# Altium PCB EMG-Arm-ELEC-V2.0.PcbDoc (part 1 of 5)
Units mil, origin at the board's own origin, x right, y up, seen from the top; angles counter-clockwise.
Board outline 8303.83 x 7532.25 mil, 2 copper layers (Top Layer, Bottom Layer), stack 3.556 mil thick; 263 components, 174 nets, 696 pads, 313 vias.
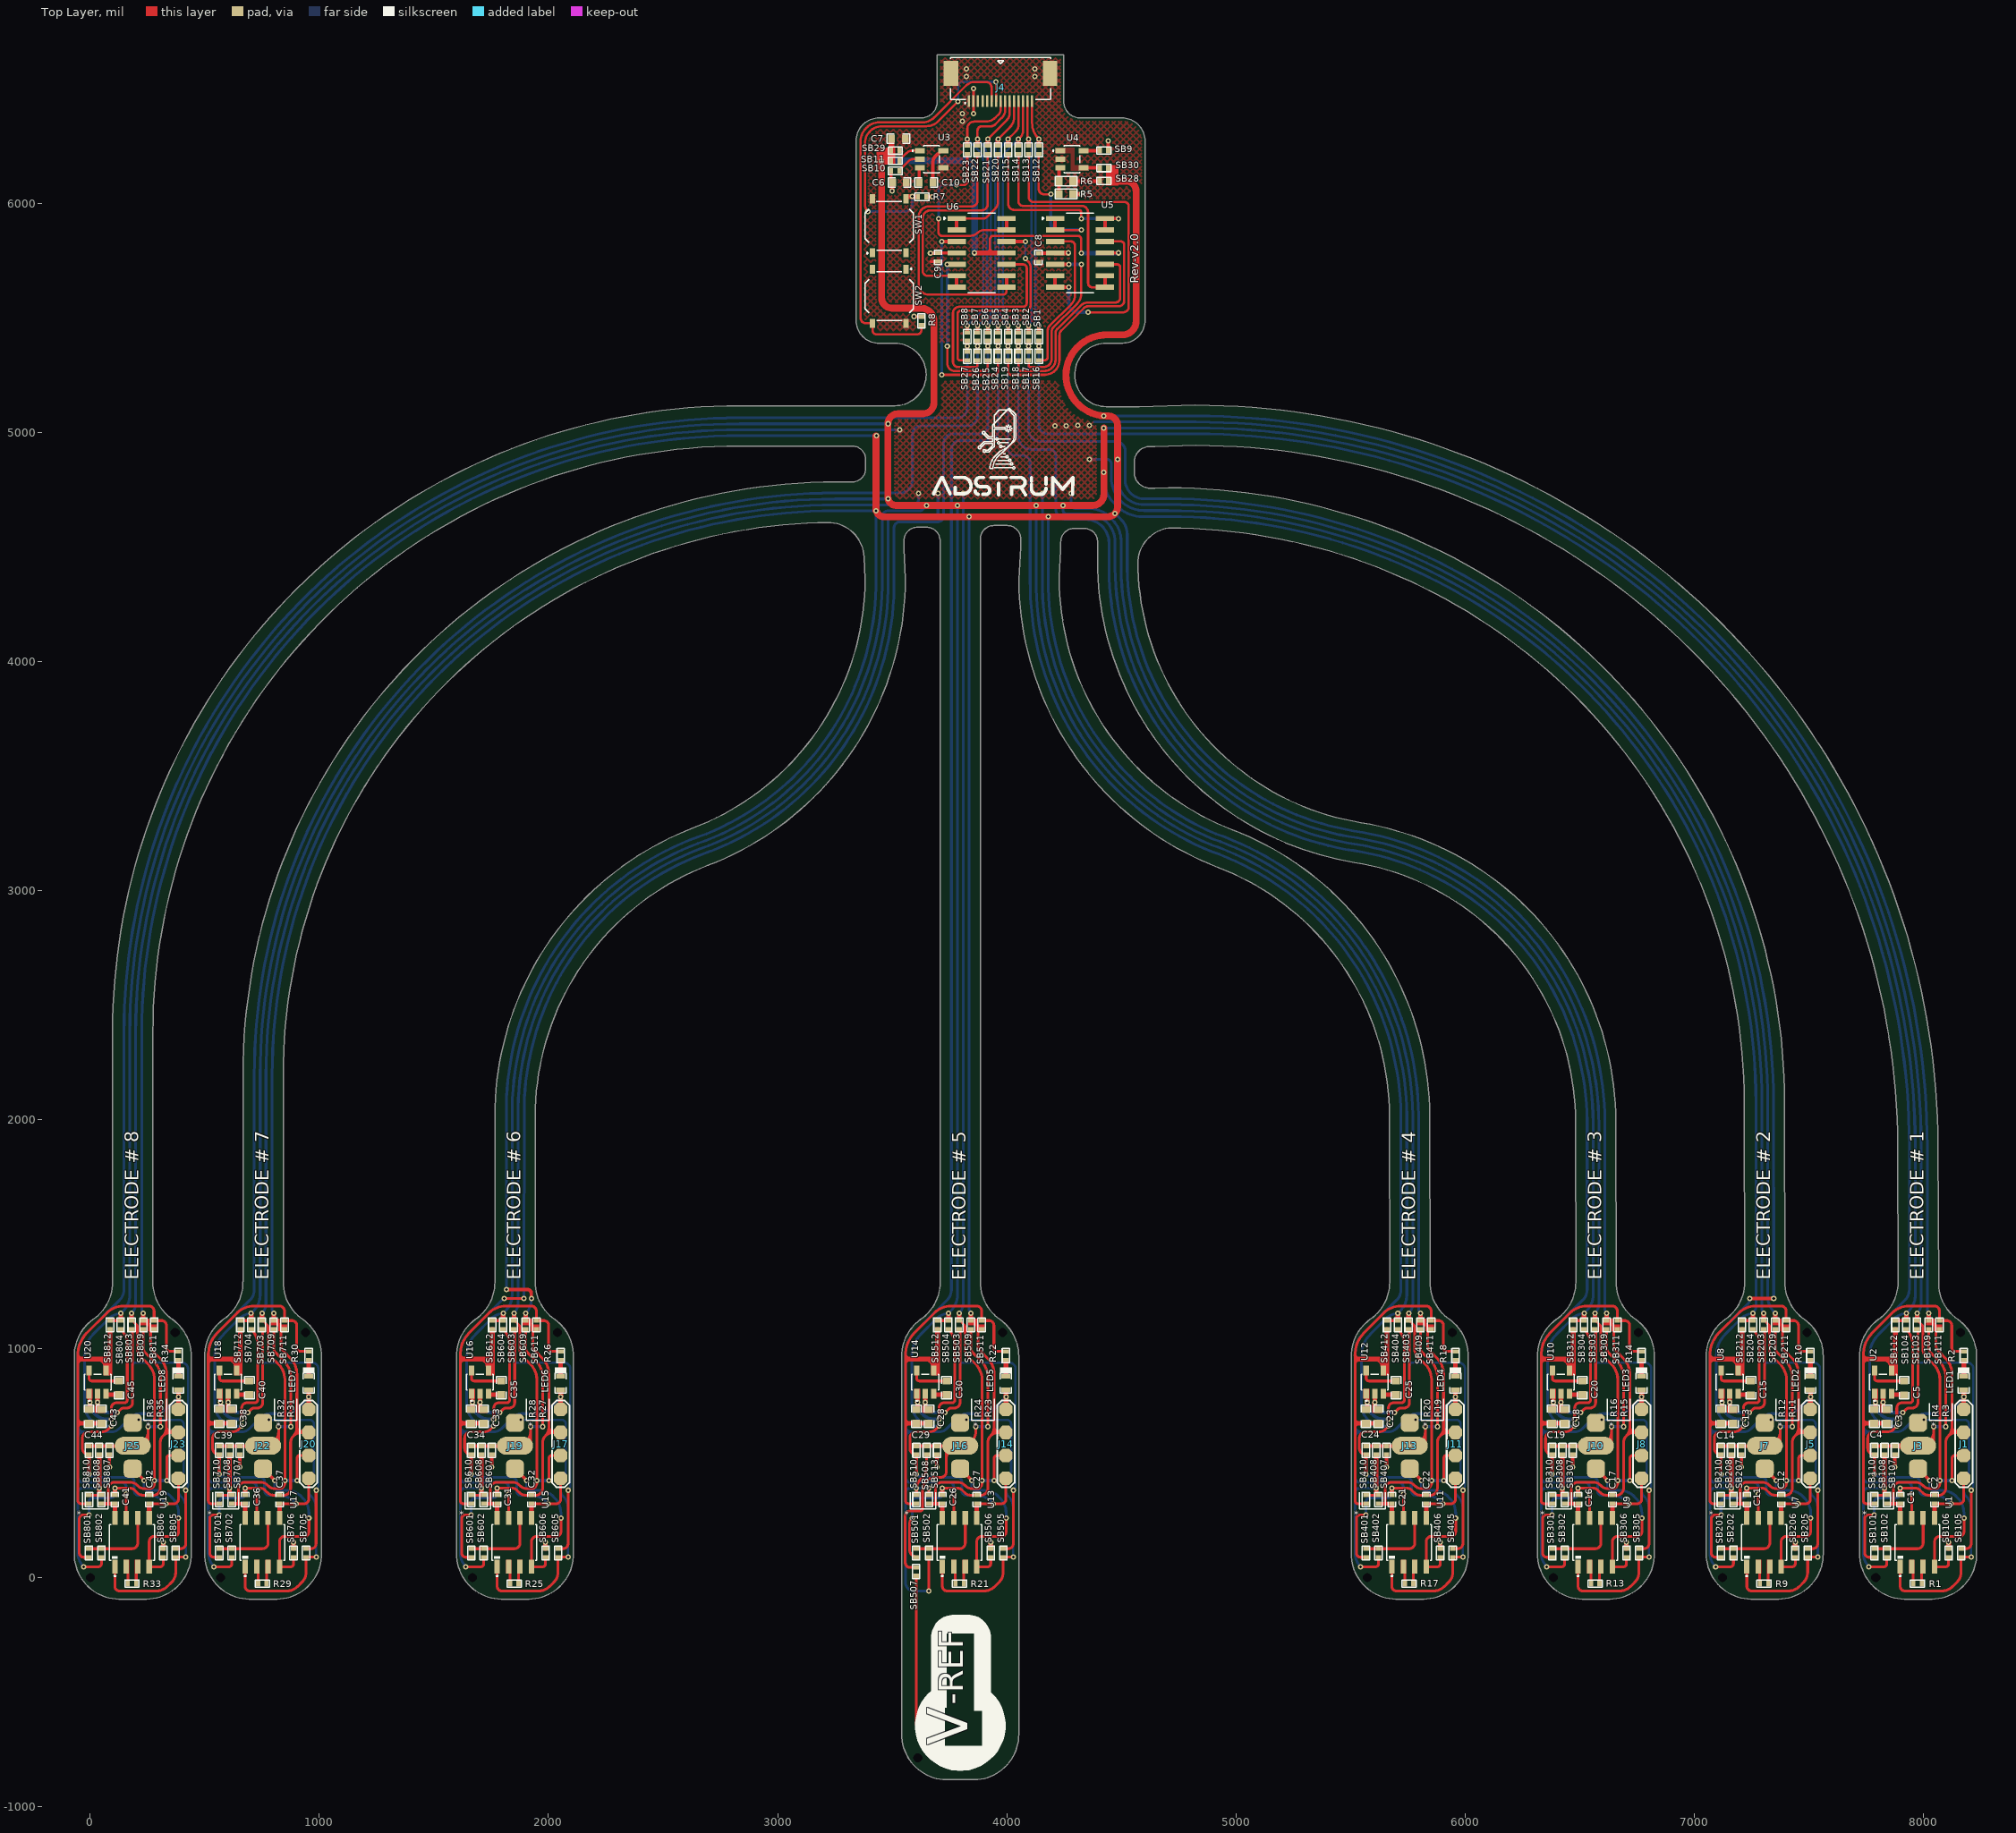
[diagram p0: Top Layer view]
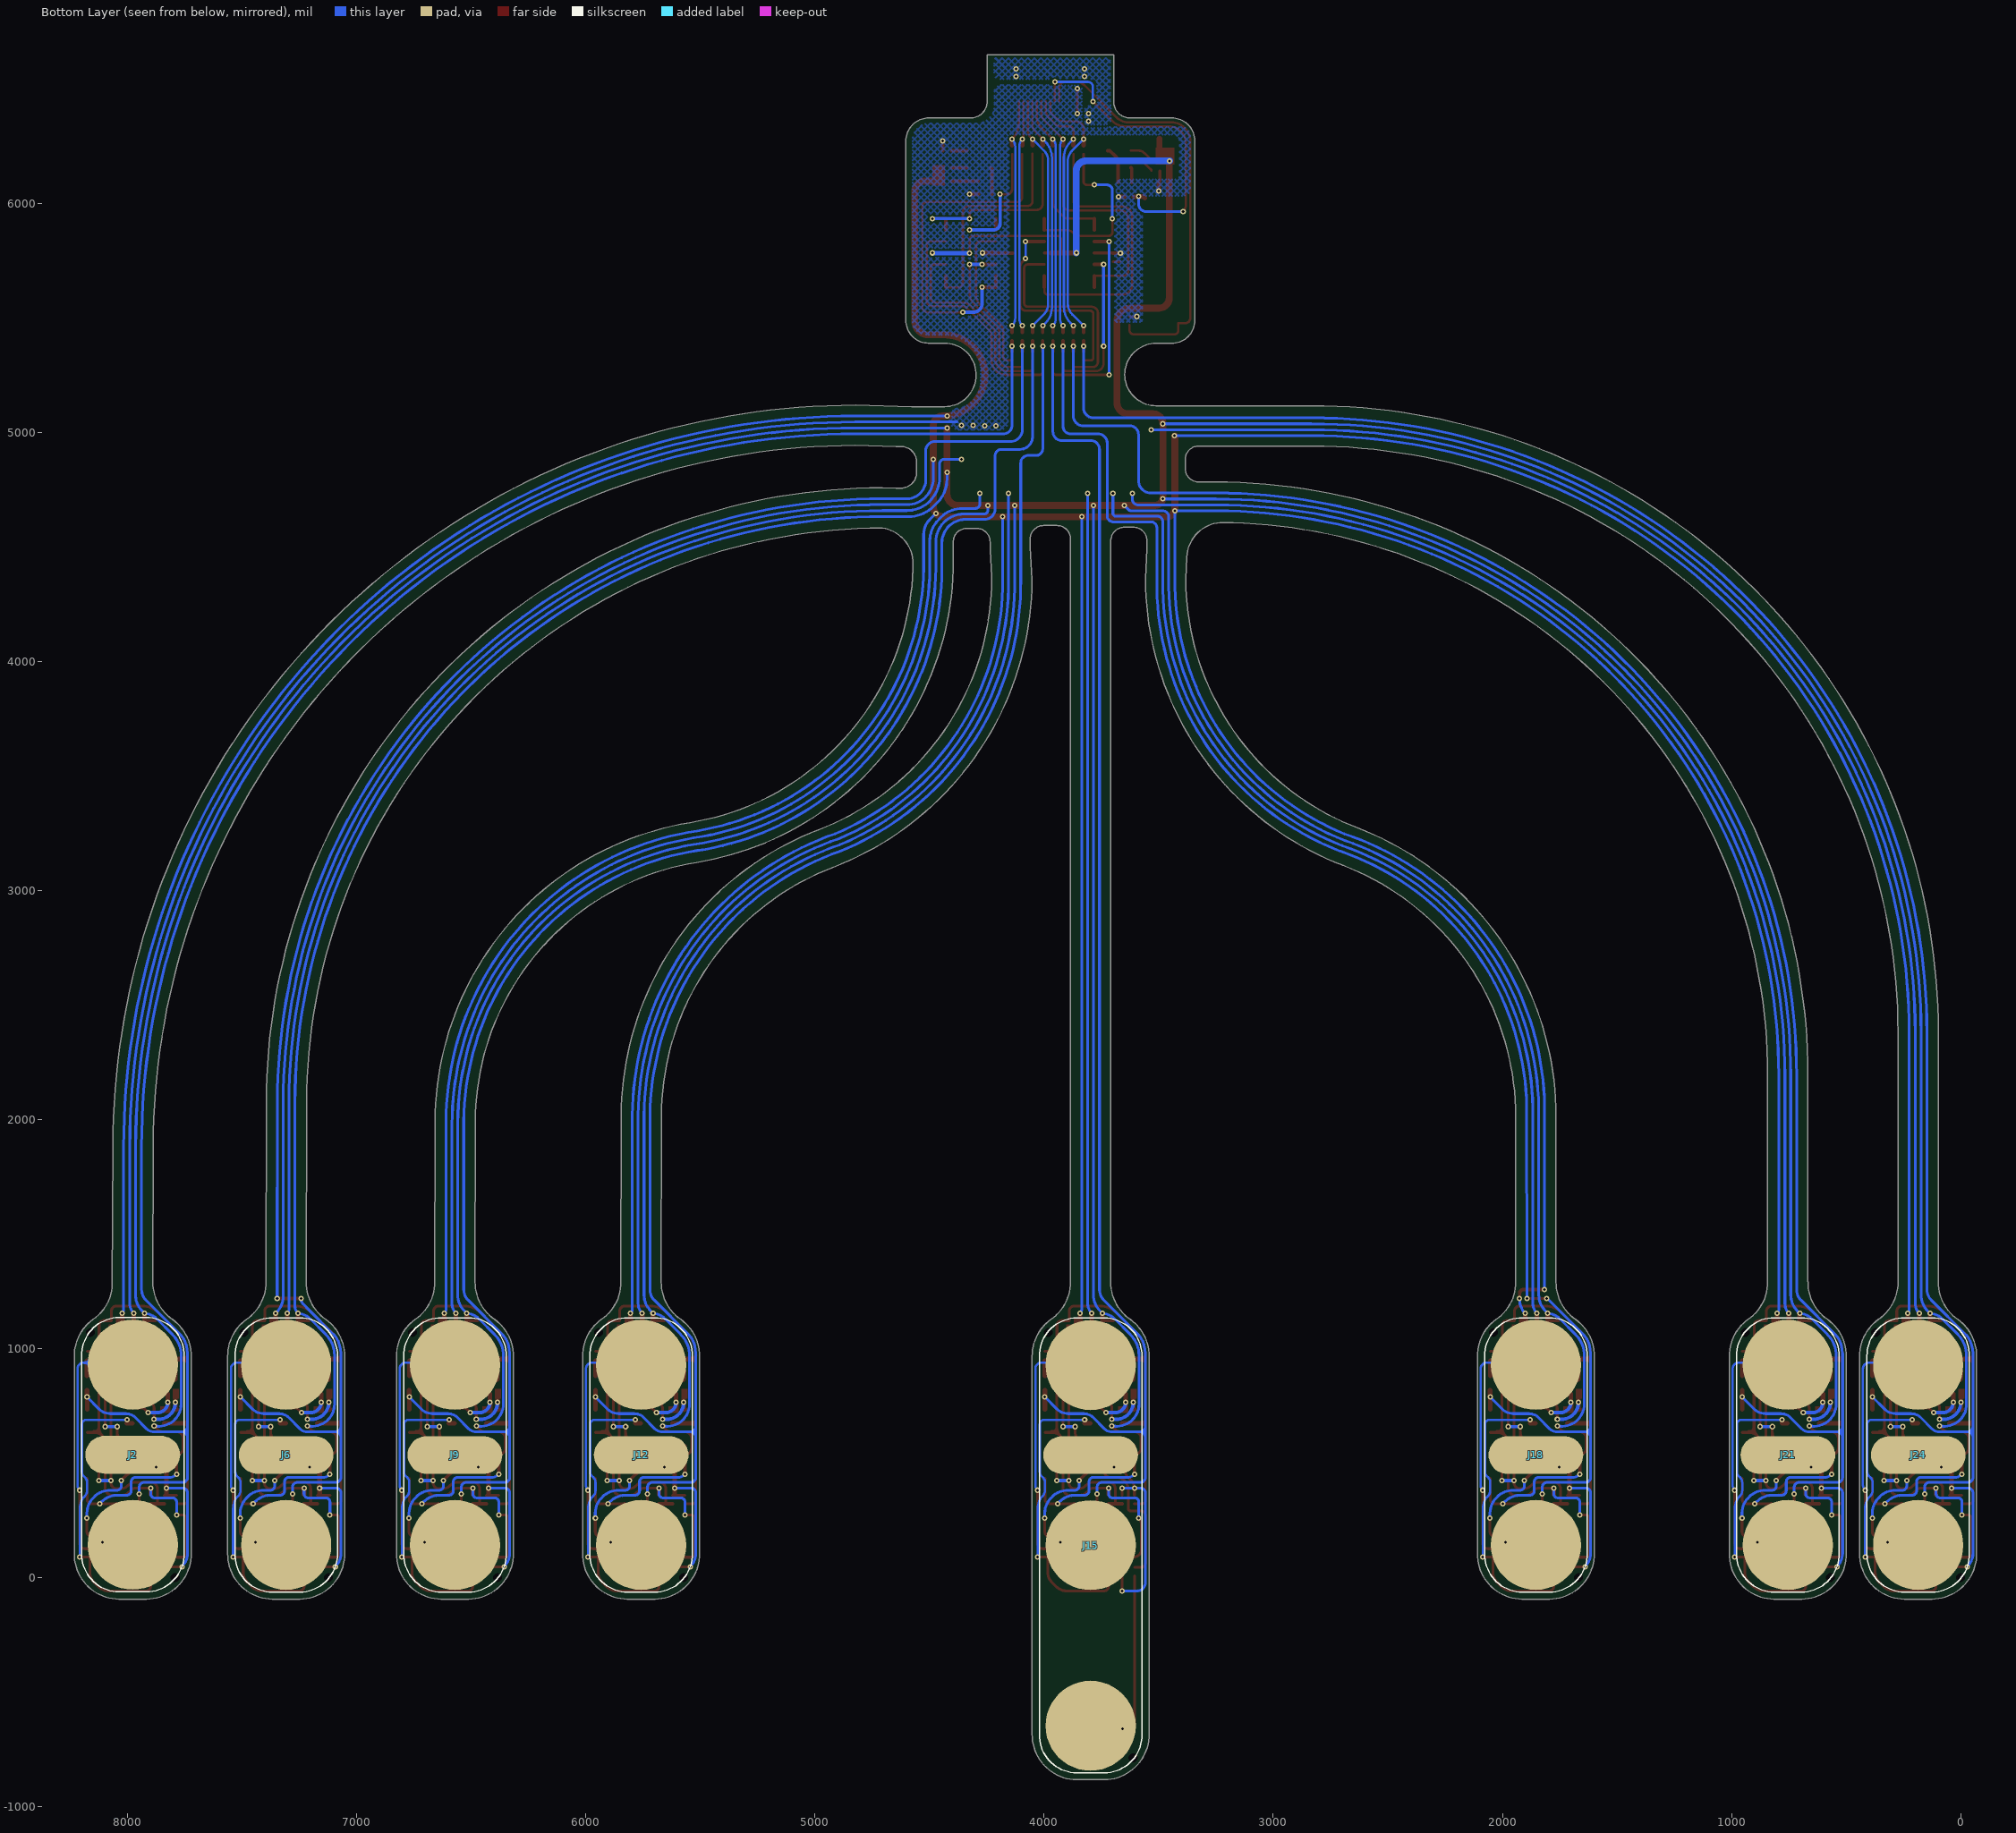
[diagram p1: Bottom Layer view, seen from below]

## Layer stack, top to bottom
Top Solder: solder mask 0.5, Solder Resist, Dk 3.5
Top Layer: signal copper 1.378
Dielectric 1: dielectric 0.8, Flex, Dk 4.8
Bottom Layer: signal copper 1.378
Bottom Solder: solder mask 0.5, Solder Resist, Dk 3.5

## Board outline
-70,104.26 ccw(c126.84,102.05) 124.63,-94.79 245.86,-94.79 ccw(c243.65,102.05) 440.49,104.26 440.49,964.73 ccw(c243.67,966.94) 358.69,1126.66 358.63,1126.58 cw(c470.07,1288.83) 273.25,1291.04 273.24,1291.04 273.24,2378.83 cw(c2834.23,2378.83) 2834.29,4939.83 3325.21,4939.83 cw(c3325.21,4880.77) 3384.26,4880.77 3384.26,4841.93 cw(c3325.21,4841.93) 3325.21,4782.87 3255.48,4782.87 ccw(c3255.52,2193.58) 666.23,2193.58 666.23,1291.04 666.22,1291.04 cw(c469.4,1288.83) 580.84,1126.58 580.79,1126.66 ccw(c695.8,966.94) 498.98,964.73 498.98,104.27 ccw(c695.82,102.05) 693.6,-94.79 814.84,-94.79 ccw(c812.63,102.05) 1009.47,104.26 1009.46,964.73 ccw(c812.65,966.94) 927.66,1126.66 927.61,1126.58 cw(c1039.05,1288.83) 842.23,1291.04 842.22,1291.04 842.22,2193.58 cw(c3255.52,2193.58) 3128.55,4603.55 cw(c3234.74,2193.71) 3219.49,4605.84 cw(c3220.49,4448.36) 3377.84,4454.78 3381.76,4358.72 cw(c2215.67,4361.9) 2632.93,3273.02 ccw(c3116.02,2012.41) 1766.02,2012.44 1766.02,1291.04 1766,1291.04 cw(c1569.19,1288.83) 1680.63,1126.58 1680.57,1126.66 ccw(c1795.58,966.94) 1598.77,964.73 1598.76,104.27 ccw(c1795.6,102.05) 1793.39,-94.79 1914.62,-94.79 ccw(c1912.41,102.05) 2109.25,104.26 2109.25,964.73 ccw(c1912.43,966.94) 2027.45,1126.66 2027.39,1126.58 cw(c2138.83,1288.83) 1942.01,1291.04 1942,1291.04 1942,2012.44 cw(c3116.02,2012.41) 2695.9,3108.69 ccw(c2215.67,4361.9) 3557.75,4360.43 3557.75,4362.18 3552.54,4489.77 3552.13,4533.39 cw(c3610.76,4526.35) 3610.76,4585.41 3650.17,4585.41 cw(c3650.17,4526.35) 3708.8,4533.39 3709.22,4531.82 3709.22,4526.82 3709.22,4526.35 3709.22,4510.82 3709.49,1291.04 cw(c3512.67,1288.83) 3624.11,1126.58 3624.05,1126.66 ccw(c3739.07,966.94) 3542.25,964.73 3542.24,-684.15 ccw(c3739.08,-686.36) 3736.87,-883.2 3858.1,-883.2 ccw(c3855.89,-686.36) 4052.73,-684.15 4052.73,964.73 ccw(c3855.92,966.94) 3970.93,1126.66 3970.87,1126.6 cw(c4082.29,1288.82) 3885.5,1291.03 3885.21,4497.17 3885.21,4536.86 3885.63,4540.8 cw(c3944.26,4533.75) 3944.26,4592.81 4002.22,4592.81 cw(c4002.22,4533.75) 4060.85,4540.8 4060.53,4497.17 4052.73,4357.28 4052.76,4354.28 ccw(c5409.7,4366.62) 4922.45,3100.12 4922.56,3100.07 cw(c4505.83,2012.62) 5670.39,2014.6 5671.65,1291.04 cw(c5474.84,1288.83) 5586.28,1126.58 5586.22,1126.66 ccw(c5701.23,966.94) 5504.42,964.73 5504.41,104.27 ccw(c5701.25,102.05) 5699.04,-94.79 5820.27,-94.79 ccw(c5818.06,102.05) 6014.9,104.26 6014.9,964.73 ccw(c5818.08,966.94) 5933.1,1126.66 5933.04,1126.58 cw(c6044.48,1288.83) 5847.66,1291.04 5847.64,1291.04 5846.38,2014.91 ccw(c4505.83,2012.62) 4985.54,3264.41 cw(c5409.7,4366.62) 4250.32,4141.6 cw(c5418.61,4362.09) 4229.7,4362.09 4229.73,4370.52 4236.1,4484.91 4236.1,4521.26 cw(c4295.15,4521.26) 4295.15,4580.31 4338.1,4580.31 cw(c4338.1,4521.26) 4397.15,4521.26 4397.15,4477.64 4397.05,4477.64 4396.52,4440.26 ccw(c5732.96,4440.77) 5518.25,3121.69 cw(c5333.55,1987.03) 6483.14,1989.04 6484.36,1291.03 cw(c6287.55,1288.82) 6398.99,1126.58 6398.93,1126.66 ccw(c6513.95,966.93) 6317.13,964.72 6317.12,104.26 ccw(c6513.96,102.05) 6511.75,-94.79 6632.98,-94.79 ccw(c6630.77,102.05) 6827.61,104.26 6827.61,964.72 ccw(c6630.79,966.93) 6745.81,1126.66 6745.75,1126.58 cw(c6857.19,1288.82) 6660.37,1291.03 6660.35,1291.04 6659.13,1989.35 ccw(c5333.55,1987.03) 5546.52,3295.39 cw(c5732.97,4440.76) 4572.52,4440.33 cw(c4729.33,4425.89) 4706,4581.63 cw(c4706.54,2068.44) 7219.73,2072.88 7221.11,1291.04 cw(c7024.3,1288.83) 7135.74,1126.58 7135.68,1126.67 ccw(c7250.69,966.94) 7053.88,964.73 7053.87,104.27 ccw(c7250.71,102.05) 7248.5,-94.78 7369.73,-94.78 ccw(c7367.52,102.05) 7564.36,104.26 7564.36,964.73 ccw(c7367.54,966.94) 7482.56,1126.66 7482.5,1126.58 cw(c7593.94,1288.83) 7397.12,1291.04 7397.1,1291.05 7395.72,2073.19 ccw(c4706.54,2068.44) 4705.96,4757.61 4705.96,4757.63 4647.3,4756.67 4618.94,4756.67 cw(c4625.02,4824.72) 4556.7,4824.72 4556.7,4869.66 cw(c4625.02,4869.66) 4619.1,4937.72 4647.3,4937.72 4825.22,4942.26 cw(c4824.92,1877.62) 7889.55,1882.97 7890.59,1291.04 cw(c7693.77,1288.83) 7805.21,1126.58 7805.15,1126.66 ccw(c7920.17,966.94) 7723.35,964.72 7723.35,104.27 ccw(c7920.19,102.05) 7917.97,-94.79 8039.21,-94.79 ccw(c8037,102.05) 8233.83,104.26 8233.83,964.72 ccw(c8037.01,966.93) 8152.03,1126.66 8151.74,1126.74 cw(c8261.29,1286.23) 8067.9,1280.27 8065.54,1883.28 ccw(c4824.92,1877.62) 4824.02,5118.25 4822.96,5118.25 4578.3,5112.01 4434.22,5112.01 cw(c4434.22,5248.13) 4298.1,5248.13 cw(c4434.13,5253.04) 4434.13,5389.16 4505.79,5389.16 ccw(c4505.79,5486.35) 4574.52,5417.62 ccw(c4503.84,5488.3) 4603.79,5488.3 4603.79,6272.28 ccw(c4503.75,6272.28) 4574.49,6343.03 ccw(c4503.81,6272.35) 4503.81,6372.3 4321.09,6372.3 cw(c4321.09,6443.82) 4249.58,6443.82 4249.58,6649.05 3696.9,6649.05 3696.9,6443.82 cw(c3625.39,6443.82) 3625.39,6372.3 3442.67,6372.3 ccw(c3442.67,6272.35) 3371.99,6343.03 ccw(c3442.74,6272.28) 3342.69,6272.28 3342.69,5488.3 ccw(c3442.64,5488.3) 3371.97,5417.62 ccw(c3443.37,5489.02) 3443.37,5388.05 3512.26,5388.05 cw(c3512.26,5251.93) 3648.38,5251.93 cw(c3512.26,5251.93) 3512.26,5115.81 2834.29,5115.81 ccw(c2834.23,2378.83) 97.26,2378.83 97.25,1291.04 97.24,1291.04 cw(c-99.57,1288.83) 11.87,1126.58 11.81,1126.66 ccw(c126.82,966.94) -69.99,964.73

## Design rules (kind name [scope] priority, off if disabled: settings)
BoardOutlineClearance [All] p1: gap=0 ignorepadtopadclearanceinfootprint=FALSE except(9: Arc-OutlineEdge Track-OutlineEdge; 10: SMDPad-OutlineEdge THPad-OutlineEdge Via-OutlineEdge Fill-OutlineEdge Poly-OutlineEdge Region-OutlineEdge)
Clearance [All] p1: gap=7 ignorepadtopadclearanceinfootprint=FALSE except(5: SMDPad-SMDPad)
ComponentClearance [All] p1: gap=0 collisioncheckmode=3 verticalgap=0 showdistances=FALSE
MinimumSolderMaskSliver [All] p1: minsoldermaskwidth=0
PolygonConnect [All] p1: connectstyle=Direct reliefconductorwidth=10 reliefentries=4 polygonreliefangle="90 Angle" airgapwidth=10
RoutingVias [All] p1: holewidth=11.81 width=23.62 viastyle="Through Hole" minholewidth=7.87 minwidth=13.78 maxholewidth=31.5 maxwidth=62.99
SilkToSilkClearance [All] p1: silktosilkclearance=0
SilkToSolderMaskClearance [IsPad] p1: minsilkscreentomaskgap=0 clearancetoexposedcopper=TRUE
SolderMaskExpansion [All] p1: expansion=4 istentingtop=FALSE
SupplyNets "Schematic Supply Nets_27" [InNet('GND_ELEC6')] p1: voltage=0.000
SupplyNets "Schematic Supply Nets_26" [InNet('GND_ELEC2')] p2: voltage=0.000
SupplyNets "Schematic Supply Nets_25" [InNet('VCC/2-4')] p3: voltage=0.000
SupplyNets "Schematic Supply Nets_24" [InNet('GND_ELEC7')] p4: voltage=0.000
SupplyNets "Schematic Supply Nets_23" [InNet('GND_ELEC5')] p5: voltage=0.000
SupplyNets "Schematic Supply Nets_22" [InNet('VCC/2-8')] p6: voltage=0.000
SupplyNets "Schematic Supply Nets_21" [InNet('VCC/2-2')] p7: voltage=0.000
SupplyNets "Schematic Supply Nets_20" [InNet('-VCC_3V3')] p8: voltage=0.000
SupplyNets "Schematic Supply Nets_19" [InNet('GND')] p9: voltage=0.000
SupplyNets "Schematic Supply Nets_18" [InNet('VCC/2-6')] p10: voltage=0.000
SupplyNets "Schematic Supply Nets_17" [InNet('VCC/2-7')] p11: voltage=0.000
SupplyNets "Schematic Supply Nets_16" [InNet('GND_ELEC3')] p12: voltage=0.000
SupplyNets "Schematic Supply Nets_15" [InNet('VCC/2-3')] p13: voltage=0.000
SupplyNets "Schematic Supply Nets_14" [InNet('VREF')] p14: voltage=0.000
SupplyNets "Schematic Supply Nets_13" [InNet('VCC_3V3')] p15: voltage=0.000
SupplyNets "Schematic Supply Nets_12" [InNet('GND_ELEC8')] p16: voltage=0.000
SupplyNets "Schematic Supply Nets_11" [InNet('GND_ELEC4')] p17: voltage=0.000
SupplyNets "Schematic Supply Nets_10" [InNet('GND_ELEC1')] p18: voltage=0.000
SupplyNets "Schematic Supply Nets_9" [InNet('VCC/2-1')] p19: voltage=0.000
SupplyNets "Schematic Supply Nets_8" [InNet('VCC/2-5')] p20: voltage=0.000
SupplyNets "Schematic Supply Nets_4" [InNet('VREF_GND')] p21: voltage=0.000
Width [All] p1: maxlimit=50 minlimit=10 preferedwidth=15 minimp=50.000000 maximp=50.000000 favimp=50.000000
26 further rules are at their usual default settings.

## Classes and differential pairs
component class U_Opamp_Sheet: C6 C7 C8 C9 C10 R5 R6 SB1 SB2 SB3 SB4 SB5 SB6 SB7 SB8 SB9 SB10 SB11 SB12 SB13 SB14 SB15 SB16 SB17 SB18 SB19 SB20 SB21 SB22 SB23 SB24 SB25 SB26 SB27 U3 U4 U5 U6
component class U_Electrode_Sheet8: C41 C42 C43 C44 C45 J23 J24 J25 LED8 R33 R34 R35 R36 SB801 SB802 SB803 SB804 SB805 SB806 SB807 SB808 SB809 SB810 SB811 SB812 U19 U20
component class U_Electrode_Sheet7: C36 C37 C38 C39 C40 J20 J21 J22 LED7 R29 R30 R31 R32 SB701 SB702 SB703 SB704 SB705 SB706 SB707 SB708 SB709 SB710 SB711 SB712 U17 U18
component class U_Electrode_Sheet6: C31 C32 C33 C34 C35 J17 J18 J19 LED6 R25 R26 R27 R28 SB601 SB602 SB603 SB604 SB605 SB606 SB607 SB608 SB609 SB610 SB611 SB612 U15 U16
component class U_Electrode_Sheet5: C26 C27 C28 C29 C30 J14 J15 J16 LED5 R21 R22 R23 R24 SB501 SB502 SB503 SB504 SB505 SB506 SB507 SB508 SB509 SB510 SB511 SB512 SB513 U13 U14
component class U_Electrode_Sheet4: C21 C22 C23 C24 C25 J11 J12 J13 LED4 R17 R18 R19 R20 SB401 SB402 SB403 SB404 SB405 SB406 SB407 SB408 SB409 SB410 SB411 SB412 U11 U12
component class U_Electrode_Sheet3: C16 C17 C18 C19 C20 J8 J9 J10 LED3 R13 R14 R15 R16 SB301 SB302 SB303 SB304 SB305 SB306 SB307 SB308 SB309 SB310 SB311 SB312 U9 U10
component class U_Electrode_Sheet2: C11 C12 C13 C14 C15 J5 J6 J7 LED2 R9 R10 R11 R12 SB201 SB202 SB203 SB204 SB205 SB206 SB207 SB208 SB209 SB210 SB211 SB212 U7 U8
component class U_Electrode_Sheet1: C1 C2 C3 C4 C5 J1 J2 J3 LED1 R1 R2 R3 R4 SB101 SB102 SB103 SB104 SB105 SB106 SB107 SB108 SB109 SB110 SB111 SB112 U1 U2
component class U_Connector-Sheet: J4 R7 R8 SB28 SB29 SB30 SW1 SW2

## Components (designator, comment, footprint, x,y, rotation, side; value= is the part's Value field where it differs from the comment)
C1 "1uF" Cap-0402 7900.38,340.55 r90 top
C2 "1uF" Cap-0402 8050.38,340.55 r90 top
C3 "10uF" Cap-0603 7841.84,703.04 r90 top
C4 "10uF" Cap-0603 7787.38,703.05 r90 top
C5 "10uF" Cap-0603 7917.69,827.72 r270 top
C6 "10uF" Cap-0603 3531.89,6090.49 r0 top
C7 "10uF" Cap-0603 3527.38,6282.05 r0 top
C8 "0.1uF" Cap-0402 4138.38,5763.05 r270 top
C9 "0.1uF" Cap-0402 3699.55,5764.05 r270 top
C10 "10uF" Cap-0603 3648.26,6090.49 r180 top
C11 "1uF" Cap-0402 7230.91,340.55 r90 top
C12 "1uF" Cap-0402 7380.91,340.55 r90 top
C13 "10uF" Cap-0603 7172.36,703.04 r90 top
C14 "10uF" Cap-0603 7117.91,703.05 r90 top
C15 "10uF" Cap-0603 7248.21,827.72 r270 top
C16 "1uF" Cap-0402 6494.16,340.54 r90 top
C17 "1uF" Cap-0402 6644.16,340.54 r90 top
C18 "10uF" Cap-0603 6435.61,703.04 r90 top
C19 "10uF" Cap-0603 6381.16,703.04 r90 top
C20 "10uF" Cap-0603 6512.46,828.04 r270 top
C21 "1uF" Cap-0402 5681.45,340.55 r90 top
C22 "1uF" Cap-0402 5831.45,340.55 r90 top
C23 "10uF" Cap-0603 5622.9,703.04 r90 top
C24 "10uF" Cap-0603 5568.45,703.05 r90 top
C25 "10uF" Cap-0603 5699.75,828.05 r270 top
C26 "1uF" Cap-0402 3719.28,340.55 r90 top
C27 "1uF" Cap-0402 3869.28,340.55 r90 top
C28 "10uF" Cap-0603 3660.74,703.04 r90 top
C29 "10uF" Cap-0603 3606.28,703.05 r90 top
C30 "10uF" Cap-0603 3737.59,828.05 r270 top
C31 "1uF" Cap-0402 1775.8,340.55 r90 top
C32 "1uF" Cap-0402 1925.8,340.55 r90 top
C33 "10uF" Cap-0603 1717.25,703.04 r90 top
C34 "10uF" Cap-0603 1662.8,703.05 r90 top
C35 "10uF" Cap-0603 1794.1,828.05 r270 top
C36 "1uF" Cap-0402 676.01,340.55 r90 top
C37 "1uF" Cap-0402 826.01,340.55 r90 top
C38 "10uF" Cap-0603 617.47,703.04 r90 top
C39 "10uF" Cap-0603 563.01,703.05 r90 top
C40 "10uF" Cap-0603 694.32,828.05 r270 top
C41 "1uF" Cap-0402 107.04,340.55 r90 top
C42 "1uF" Cap-0402 257.04,340.55 r90 top
C43 "10uF" Cap-0603 48.49,703.04 r90 top
C44 "10uF" Cap-0603 -5.96,703.05 r90 top
C45 "10uF" Cap-0603 125.34,828.05 r270 top
J1 "4 Pin SMD Wire Connector" "4 Pin SMD Wire CON." 8177.54,733.06 r270 top
J2 "SEMG PAD" SEMG-PAD 7978.35,536.01 r180 bottom locked
J3 "Test Pad SMD 3 Pin" "Test Pad (SMD 3 Pin)" 7978.35,575 r180 top
J4 "8.01A0.015200" 8.01A0.015200 3973.24,6506.38 r180 top locked
J5 "4 Pin SMD Wire Connector" "4 Pin SMD Wire CON." 7508.07,733.06 r270 top
J6 "SEMG PAD" SEMG-PAD 7308.87,535 r180 bottom locked
J7 "Test Pad SMD 3 Pin" "Test Pad (SMD 3 Pin)" 7308.87,575 r180 top
J8 "4 Pin SMD Wire Connector" "4 Pin SMD Wire CON." 6771.32,733.05 r270 top
J9 "SEMG PAD" SEMG-PAD 6572.12,534.99 r180 bottom locked
J10 "Test Pad SMD 3 Pin" "Test Pad (SMD 3 Pin)" 6572.12,575 r180 top
J11 "4 Pin SMD Wire Connector" "4 Pin SMD Wire CON." 5958.6,733.06 r270 top
J12 "SEMG PAD" SEMG-PAD 5759.41,535 r180 bottom locked
J13 "Test Pad SMD 3 Pin" "Test Pad (SMD 3 Pin)" 5759.41,575 r180 top
J14 "4 Pin SMD Wire Connector" "4 Pin SMD Wire CON." 3996.44,733.06 r270 top
J15 "EMG ELECTRODE 4 pin" "EMG ELECTRODE 4 pin" 3797.24,140.8 r0 bottom
J16 "Test Pad SMD 3 Pin" "Test Pad (SMD 3 Pin)" 3797.25,575 r180 top
J17 "4 Pin SMD Wire Connector" "4 Pin SMD Wire CON." 2052.95,733.06 r270 top
J18 "SEMG PAD" SEMG-PAD 1853.76,535 r180 bottom locked
J19 "Test Pad SMD 3 Pin" "Test Pad (SMD 3 Pin)" 1853.76,575 r180 top
J20 "4 Pin SMD Wire Connector" "4 Pin SMD Wire CON." 953.17,733.06 r270 top
J21 "SEMG PAD" SEMG-PAD 753.98,535 r180 bottom locked
J22 "Test Pad SMD 3 Pin" "Test Pad (SMD 3 Pin)" 753.98,575 r180 top
J23 "4 Pin SMD Wire Connector" "4 Pin SMD Wire CON." 384.2,733.06 r270 top
J24 "SEMG PAD" SEMG-PAD 185,535 r180 bottom locked
J25 "Test Pad SMD 3 Pin" "Test Pad (SMD 3 Pin)" 185,575 r180 top
LED1 "Orange" LED-0603 8177.54,848.05 r90 top
LED2 "Orange" LED-0603 7508.07,848.05 r90 top
LED3 "Orange" LED-0603 6771.32,848.04 r90 top
LED4 "Orange" LED-0603 5958.6,848.05 r90 top
LED5 "Orange" LED-0603 3996.44,848.05 r90 top
LED6 "Orange" LED-0603 2052.96,848.05 r90 top
LED7 "Orange" LED-0603 953.17,848.05 r90 top
LED8 "Orange" LED-0603 384.2,848.05 r90 top
R1 "240R" Res-0402 7975.38,-26.95 r180 top
R2 "1K" Res-0402 8178.02,968.58 r270 top
R3 "150K" Res-0402 7841.84,340.56 r90 top
R4 "150K" Res-0402 7787.38,340.56 r270 top
R5 "64K" Res-0603 4259.05,6040.29 r0 top
R6 "64K" Res-0603 4259.05,6096.29 r0 top
R7 "10K" Res-0402 3630.26,6028.1 r0 top
R8 "10K" Res-0402 3627.42,5486.01 r90 top
R9 "240R" Res-0402 7305.91,-26.95 r180 top
R10 "1K" Res-0402 7508.55,968.58 r270 top
R11 "150K" Res-0402 7172.36,340.56 r90 top
R12 "150K" Res-0402 7117.91,340.56 r270 top
R13 "240R" Res-0402 6569.16,-26.96 r180 top
R14 "1K" Res-0402 6771.8,968.57 r270 top
R15 "150K" Res-0402 6435.61,340.55 r90 top
R16 "150K" Res-0402 6381.16,340.55 r270 top
R17 "240R" Res-0402 5756.45,-26.95 r180 top
R18 "1K" Res-0402 5959.09,968.58 r270 top
R19 "150K" Res-0402 5622.9,340.56 r90 top
R20 "150K" Res-0402 5568.45,340.56 r270 top
R21 "240R" Res-0402 3794.28,-26.95 r180 top
R22 "1K" Res-0402 3996.92,968.58 r270 top
R23 "150K" Res-0402 3660.74,340.56 r90 top
R24 "150K" Res-0402 3606.28,340.56 r270 top
R25 "240R" Res-0402 1850.8,-26.95 r180 top
R26 "1K" Res-0402 2053.44,968.58 r270 top
R27 "150K" Res-0402 1717.25,340.56 r90 top
R28 "150K" Res-0402 1662.8,340.56 r270 top
R29 "240R" Res-0402 751.01,-26.95 r180 top
R30 "1K" Res-0402 953.65,968.58 r270 top
R31 "150K" Res-0402 617.47,340.56 r90 top
R32 "150K" Res-0402 563.01,340.56 r270 top
R33 "240R" Res-0402 182.04,-26.95 r180 top
R34 "1K" Res-0402 384.68,968.58 r270 top
R35 "150K" Res-0402 48.49,340.56 r90 top
R36 "150K" Res-0402 -5.96,340.56 r270 top
SB1 "Solder Bridge 0402" "Solder Bridge 0402" 4140.38,5417.55 r90 top
SB2 "Solder Bridge 0402" "Solder Bridge 0402" 4095.77,5417.55 r90 top
SB3 "Solder Bridge 0402" "Solder Bridge 0402" 4051.17,5417.55 r90 top
SB4 "Solder Bridge 0402" "Solder Bridge 0402" 4006.56,5417.55 r90 top
SB5 "Solder Bridge 0402" "Solder Bridge 0402" 3961.95,5417.55 r90 top
SB6 "Solder Bridge 0402" "Solder Bridge 0402" 3917.35,5417.55 r90 top
SB7 "Solder Bridge 0402" "Solder Bridge 0402" 3872.74,5417.55 r90 top
SB8 "Solder Bridge 0402" "Solder Bridge 0402" 3828.13,5417.55 r90 top
SB9 "Solder Bridge 0402" "Solder Bridge 0402" 4424.61,6229.7 r180 top
SB10 "Solder Bridge 0402" "Solder Bridge 0402" 3513.54,6141.39 r0 top
SB11 "Solder Bridge 0402" "Solder Bridge 0402" 3513.54,6185.05 r180 top
SB12 "Solder Bridge 0402" "Solder Bridge 0402" 4140.38,6233.08 r90 top
SB13 "Solder Bridge 0402" "Solder Bridge 0402" 4095.77,6233.08 r90 top
SB14 "Solder Bridge 0402" "Solder Bridge 0402" 4051.17,6233.08 r90 top
SB15 "Solder Bridge 0402" "Solder Bridge 0402" 4006.56,6233.08 r90 top
SB16 "Solder Bridge 0402" "Solder Bridge 0402" 4140.38,5332.55 r270 top
SB17 "Solder Bridge 0402" "Solder Bridge 0402" 4095.77,5332.55 r270 top
SB18 "Solder Bridge 0402" "Solder Bridge 0402" 4051.17,5332.55 r270 top
SB19 "Solder Bridge 0402" "Solder Bridge 0402" 4006.56,5332.55 r270 top
SB20 "Solder Bridge 0402" "Solder Bridge 0402" 3961.95,6233.08 r90 top
SB21 "Solder Bridge 0402" "Solder Bridge 0402" 3917.35,6233.08 r90 top
SB22 "Solder Bridge 0402" "Solder Bridge 0402" 3872.74,6233.08 r90 top
SB23 "Solder Bridge 0402" "Solder Bridge 0402" 3828.13,6233.08 r90 top
SB24 "Solder Bridge 0402" "Solder Bridge 0402" 3961.95,5332.55 r270 top
SB25 "Solder Bridge 0402" "Solder Bridge 0402" 3917.35,5332.55 r270 top
SB26 "Solder Bridge 0402" "Solder Bridge 0402" 3872.74,5332.55 r270 top
SB27 "Solder Bridge 0402" "Solder Bridge 0402" 3828.13,5332.55 r270 top
SB28 "Solder Bridge 0402" "Solder Bridge 0402" 4424.61,6097.01 r180 top
SB29 "Solder Bridge 0402" "Solder Bridge 0402" 3513.54,6230.26 r0 top
SB30 "Solder Bridge 0402" "Solder Bridge 0402" 4424.61,6154.18 r0 top
SB101 "Solder Bridge 0402" "Solder Bridge 0402" 7787.36,106.67 r90 top
SB102 "Solder Bridge 0402" "Solder Bridge 0402" 7841.84,106.67 r90 top
SB103 "Solder Bridge 0402" "Solder Bridge 0402" 7973.69,1102.92 r270 top
SB104 "Solder Bridge 0402" "Solder Bridge 0402" 7926.59,1102.92 r90 top
SB105 "Solder Bridge 0402" "Solder Bridge 0402" 8166.06,106.67 r90 top
SB106 "Solder Bridge 0402" "Solder Bridge 0402" 8111.58,106.67 r90 top
SB107 "Solder Bridge 0402" "Solder Bridge 0402" 7877.05,555 r270 top
SB108 "Solder Bridge 0402" "Solder Bridge 0402" 7832.22,555 r270 top
SB109 "Solder Bridge 0402" "Solder Bridge 0402" 8024.78,1102.92 r90 top
SB110 "Solder Bridge 0402" "Solder Bridge 0402" 7787.38,555 r270 top
SB111 "Solder Bridge 0402" "Solder Bridge 0402" 8071.88,1102.92 r90 top
SB112 "Solder Bridge 0402" "Solder Bridge 0402" 7879.49,1102.92 r270 top
SB201 "Solder Bridge 0402" "Solder Bridge 0402" 7117.88,106.67 r90 top
SB202 "Solder Bridge 0402" "Solder Bridge 0402" 7172.36,106.67 r90 top
SB203 "Solder Bridge 0402" "Solder Bridge 0402" 7304.21,1102.92 r270 top
SB204 "Solder Bridge 0402" "Solder Bridge 0402" 7257.11,1102.92 r90 top
SB205 "Solder Bridge 0402" "Solder Bridge 0402" 7496.59,106.67 r90 top
SB206 "Solder Bridge 0402" "Solder Bridge 0402" 7442.11,106.67 r90 top
SB207 "Solder Bridge 0402" "Solder Bridge 0402" 7207.58,555 r270 top
SB208 "Solder Bridge 0402" "Solder Bridge 0402" 7162.74,555 r270 top
SB209 "Solder Bridge 0402" "Solder Bridge 0402" 7355.31,1102.92 r90 top
SB210 "Solder Bridge 0402" "Solder Bridge 0402" 7117.9,555 r270 top
SB211 "Solder Bridge 0402" "Solder Bridge 0402" 7402.41,1102.92 r90 top
SB212 "Solder Bridge 0402" "Solder Bridge 0402" 7210.02,1102.92 r270 top
SB301 "Solder Bridge 0402" "Solder Bridge 0402" 6381.13,106.66 r90 top
SB302 "Solder Bridge 0402" "Solder Bridge 0402" 6435.61,106.66 r90 top
SB303 "Solder Bridge 0402" "Solder Bridge 0402" 6567.46,1102.91 r270 top
SB304 "Solder Bridge 0402" "Solder Bridge 0402" 6520.37,1102.91 r90 top
SB305 "Solder Bridge 0402" "Solder Bridge 0402" 6759.84,106.66 r90 top
SB306 "Solder Bridge 0402" "Solder Bridge 0402" 6705.36,106.66 r90 top
SB307 "Solder Bridge 0402" "Solder Bridge 0402" 6470.83,555 r270 top
SB308 "Solder Bridge 0402" "Solder Bridge 0402" 6425.99,555 r270 top
SB309 "Solder Bridge 0402" "Solder Bridge 0402" 6618.56,1102.91 r90 top
SB310 "Solder Bridge 0402" "Solder Bridge 0402" 6381.16,555 r270 top
SB311 "Solder Bridge 0402" "Solder Bridge 0402" 6665.66,1102.91 r90 top
SB312 "Solder Bridge 0402" "Solder Bridge 0402" 6473.27,1102.91 r270 top
SB401 "Solder Bridge 0402" "Solder Bridge 0402" 5568.42,106.67 r90 top
SB402 "Solder Bridge 0402" "Solder Bridge 0402" 5622.9,106.67 r90 top
SB403 "Solder Bridge 0402" "Solder Bridge 0402" 5754.75,1102.92 r270 top
SB404 "Solder Bridge 0402" "Solder Bridge 0402" 5707.65,1102.92 r90 top
SB405 "Solder Bridge 0402" "Solder Bridge 0402" 5947.12,106.67 r90 top
SB406 "Solder Bridge 0402" "Solder Bridge 0402" 5892.64,106.67 r90 top
SB407 "Solder Bridge 0402" "Solder Bridge 0402" 5658.12,555 r270 top
SB408 "Solder Bridge 0402" "Solder Bridge 0402" 5613.28,555 r270 top
SB409 "Solder Bridge 0402" "Solder Bridge 0402" 5805.85,1102.92 r90 top
SB410 "Solder Bridge 0402" "Solder Bridge 0402" 5568.45,555 r270 top
SB411 "Solder Bridge 0402" "Solder Bridge 0402" 5852.94,1102.92 r90 top
SB412 "Solder Bridge 0402" "Solder Bridge 0402" 5660.56,1102.92 r270 top
SB501 "Solder Bridge 0402" "Solder Bridge 0402" 3605,106.67 r90 top
SB502 "Solder Bridge 0402" "Solder Bridge 0402" 3660.74,106.67 r90 top
SB503 "Solder Bridge 0402" "Solder Bridge 0402" 3792.59,1102.92 r270 top
SB504 "Solder Bridge 0402" "Solder Bridge 0402" 3745.49,1102.92 r90 top
SB505 "Solder Bridge 0402" "Solder Bridge 0402" 3984.96,106.67 r90 top
SB506 "Solder Bridge 0402" "Solder Bridge 0402" 3930.48,106.67 r90 top
SB507 "Solder Bridge 0402" "Solder Bridge 0402" 3605,25.5 r270 top
SB508 "Solder Bridge 0402" "Solder Bridge 0402" 3651.12,555 r270 top
SB509 "Solder Bridge 0402" "Solder Bridge 0402" 3843.68,1102.92 r90 top
SB510 "Solder Bridge 0402" "Solder Bridge 0402" 3606.28,555 r270 top
SB511 "Solder Bridge 0402" "Solder Bridge 0402" 3890.78,1102.92 r90 top
SB512 "Solder Bridge 0402" "Solder Bridge 0402" 3698.39,1102.92 r270 top
SB513 "Solder Bridge 0402" "Solder Bridge 0402" 3696.5,555 r270 top
SB601 "Solder Bridge 0402" "Solder Bridge 0402" 1662.77,106.67 r90 top
SB602 "Solder Bridge 0402" "Solder Bridge 0402" 1717.25,106.67 r90 top
SB603 "Solder Bridge 0402" "Solder Bridge 0402" 1849.1,1102.92 r270 top
SB604 "Solder Bridge 0402" "Solder Bridge 0402" 1802,1102.92 r90 top
SB605 "Solder Bridge 0402" "Solder Bridge 0402" 2041.48,106.67 r90 top
SB606 "Solder Bridge 0402" "Solder Bridge 0402" 1987,106.67 r90 top
SB607 "Solder Bridge 0402" "Solder Bridge 0402" 1752.47,555 r270 top
SB608 "Solder Bridge 0402" "Solder Bridge 0402" 1707.63,555 r270 top
SB609 "Solder Bridge 0402" "Solder Bridge 0402" 1900.2,1102.92 r90 top
SB610 "Solder Bridge 0402" "Solder Bridge 0402" 1662.8,555 r270 top
SB611 "Solder Bridge 0402" "Solder Bridge 0402" 1947.3,1102.92 r90 top
SB612 "Solder Bridge 0402" "Solder Bridge 0402" 1754.91,1102.92 r270 top
SB701 "Solder Bridge 0402" "Solder Bridge 0402" 562.99,106.67 r90 top
SB702 "Solder Bridge 0402" "Solder Bridge 0402" 617.47,106.67 r90 top
SB703 "Solder Bridge 0402" "Solder Bridge 0402" 749.32,1102.92 r270 top
SB704 "Solder Bridge 0402" "Solder Bridge 0402" 702.22,1102.92 r90 top
SB705 "Solder Bridge 0402" "Solder Bridge 0402" 941.69,106.67 r90 top
SB706 "Solder Bridge 0402" "Solder Bridge 0402" 887.21,106.67 r90 top
SB707 "Solder Bridge 0402" "Solder Bridge 0402" 652.68,555 r270 top
SB708 "Solder Bridge 0402" "Solder Bridge 0402" 607.85,555 r270 top
SB709 "Solder Bridge 0402" "Solder Bridge 0402" 800.42,1102.92 r90 top
SB710 "Solder Bridge 0402" "Solder Bridge 0402" 563.01,555 r270 top
SB711 "Solder Bridge 0402" "Solder Bridge 0402" 847.51,1102.92 r90 top
SB712 "Solder Bridge 0402" "Solder Bridge 0402" 655.12,1102.92 r270 top
SB801 "Solder Bridge 0402" "Solder Bridge 0402" -5.99,106.67 r90 top
SB802 "Solder Bridge 0402" "Solder Bridge 0402" 48.49,106.67 r90 top
SB803 "Solder Bridge 0402" "Solder Bridge 0402" 180.34,1102.92 r270 top
SB804 "Solder Bridge 0402" "Solder Bridge 0402" 132.24,1102.92 r90 top
SB805 "Solder Bridge 0402" "Solder Bridge 0402" 372.72,106.67 r90 top
SB806 "Solder Bridge 0402" "Solder Bridge 0402" 318.24,106.67 r90 top
SB807 "Solder Bridge 0402" "Solder Bridge 0402" 83.71,555 r270 top
SB808 "Solder Bridge 0402" "Solder Bridge 0402" 38.87,555 r270 top
SB809 "Solder Bridge 0402" "Solder Bridge 0402" 231.44,1102.92 r90 top
SB810 "Solder Bridge 0402" "Solder Bridge 0402" -5.97,555 r270 top
SB811 "Solder Bridge 0402" "Solder Bridge 0402" 278.54,1102.92 r90 top
SB812 "Solder Bridge 0402" "Solder Bridge 0402" 86.15,1102.92 r270 top
SW1 "TC-0522C-1.7-260G" TC-0522C-1.7-260G_ 3487.28,5901.3 r90 top value=-
SW2 "TC-0522C-1.7-260G" TC-0522C-1.7-260G_ 3487.28,5594.3 r270 top value=-
U1 "AD8221ARZ-R7" SOIC-8 7975.38,153.05 r90 top
U2 "SGM3207YN5G/TR" SOT-23-5 7825.38,853.05 r90 top
U3 "SGM3207YN5G/TR" SOT-23-5 3672.28,6192.3 r0 top
U4 "TPMCP6021T-E/OT" SOT-23-5 4285.38,6192.3 r0 top
U5 "LM324DT" 14-SO 4320.38,5783.05 r0 top
U6 "LM324DT" 14-SO 3890.38,5783.05 r0 top
U7 "AD8221ARZ-R7" SOIC-8 7305.91,153.05 r90 top
U8 "SGM3207YN5G/TR" SOT-23-5 7155.91,853.05 r90 top
U9 "AD8221ARZ-R7" SOIC-8 6569.16,153.04 r90 top
U10 "SGM3207YN5G/TR" SOT-23-5 6419.16,853.04 r90 top
U11 "AD8221ARZ-R7" SOIC-8 5756.44,153.05 r90 top
U12 "SGM3207YN5G/TR" SOT-23-5 5606.45,853.05 r90 top
U13 "AD8221ARZ-R7" SOIC-8 3794.28,153.05 r90 top
U14 "SGM3207YN5G/TR" SOT-23-5 3644.28,853.05 r90 top
U15 "AD8221ARZ-R7" SOIC-8 1850.8,153.05 r90 top
U16 "SGM3207YN5G/TR" SOT-23-5 1700.8,853.05 r90 top
U17 "AD8221ARZ-R7" SOIC-8 751.01,153.05 r90 top
U18 "SGM3207YN5G/TR" SOT-23-5 601.01,853.05 r90 top
U19 "AD8221ARZ-R7" SOIC-8 182.04,153.05 r90 top
U20 "SGM3207YN5G/TR" SOT-23-5 32.04,853.05 r90 top

## Footprints (in the part's own frame and the unit in brackets; to place one, negate y for a bottom-side part, rotate by r counter-clockwise, add the part's x,y. Pads: shape width x height; smd on the part's side, far side on the other; paste and mask are expansions set on the pad)
"4 Pin SMD Wire CON." [mm]
  oct 1.5x1.5 smd: 1(0,0) 2(2.54,0) 3(5.08,0) 4(7.62,0)
  silkscreen extent -0.98,-0.97 8.6,0.97
8.01A0.015200 [mm]
  rect 0.25x1.3 smd paste+0 mask+0.05: 1(3.5,1.54) 2(3,1.54) 3(2.5,1.54) 4(2,1.54) 5(1.5,1.54) 6(1,1.54) 7(0.5,1.54) 8(0,1.54) 9(-0.5,1.54) 10(-1,1.54) 11(-1.5,1.54) 12(-2,1.54) 13(-2.5,1.54) 14(-3,1.54) 15(-3.5,1.54)
  rect 1.6x2.8 smd paste+0 mask+0.05: MP1(-5.5,-1.54) MP2(5.5,-1.54)
  silkscreen extent -5.55,-3.28 5.55,1.86, body extent -5.8,-3.58 5.8,2.32, height 2.02
14-SO [mil]
  rect 80.24x22.6 smd: 1(-109.02,150) 2(-109.02,100) 3(-109.02,50) 4(-109.02,0) 5(-109.02,-50) 6(-109.02,-100) 7(-109.02,-150) 8(109.02,-150) 9(109.02,-100) 10(109.02,-50) 11(109.02,0) 12(109.02,50) 13(109.02,100) 14(109.02,150)
  silkscreen extent -164,-173 60,173, body extent -118,-170 118,170, height 69
Cap-0402 [mil]
  rect 18x25 smd mask+2.36: 1(-18.5,0) 2(18.5,0)
  silkscreen extent -31,-16 31,16, body extent -20,-10 20,10, height 19
Cap-0603 [mil]
  rect 30x35 smd mask+2.36: 1(-30,0) 2(30,0)
  silkscreen extent -49,-21 49,21, body extent -32,-16 31,16, height 34
"EMG ELECTRODE 4 pin" [mm]
  round 10 smd: 1(0,-19.974) 2(0,0) 3(0,20.026)
  oval 10.5x4.2 smd: 4(0,-10)
  silkscreen extent -5.68,-25.2 5.68,25.25
LED-0603 [mm]
  rect 0.5x1 smd: 1(-0.75,0) 2(0.75,0)
  silkscreen extent -1.12,-0.66 1.75,0.66, body extent -0.82,-0.37 0.82,0.36, height 0.68
Res-0402 [mil]
  rect 18x25 smd mask+2.17: 1(-18.5,0) 2(18.5,0)
  silkscreen extent -32,-17 32,16, body extent -23,-11 23,11, height 16
Res-0603 [mil]
  rect 30x35 smd: 1(-30,0) 2(30,0)
  silkscreen extent -48,-21 48,21, body extent -31,-17 31,17, height 18
SEMG-PAD [mm]
  round 10 smd: 1(0,9.987) 2(0,-9.987)
  oval 10.5x4.2 smd: 3(0,-0.013)
  silkscreen extent -5.68,-15.21 5.68,15.21
SOIC-8 [mm]
  rect 1.55x0.6 smd: 1(-2.7,1.905) 2(-2.7,0.635) 3(-2.7,-0.635) 4(-2.7,-1.905) 5(2.7,-1.905) 6(2.7,-0.635) 7(2.7,0.635) 8(2.7,1.905)
  silkscreen extent -3.76,-2.49 1.99,2.49, body extent -3,-2.45 3,2.45, height 1.7
"Solder Bridge 0402" [mil]
  rect 18x25 smd mask+2.17: 1(-18.5,0) 2(18.5,0)
  silkscreen extent -32,-17 32,16
SOT-23-5 [mm]
  rect 1.1x0.6 smd: 1(-1.3,0.95) 2(-1.3,0) 3(-1.3,-0.95) 4(1.3,-0.95) 5(1.3,0.95)
  silkscreen extent -2.13,-1.5 0.88,1.5, body extent -1.4,-1.45 1.4,1.45, height 1.45
TC-0522C-1.7-260G_ [mm]
  rect 1x0.6 smd: 1(-3,1.85) 2(3,1.85) 3(3,-1.85) 4(-3,-1.85)
  silkscreen extent -3.15,-2.67 2.72,2.67, body extent -3.2,-2.6 3.2,2.6, height 1.7
"Test Pad (SMD 3 Pin)" [mm]
  rrect50% 2x2 smd: 1(0,2.54) 3(0,-2.54)
  oval 4x2 smd: 2(0,0)

## Part data
C1 C2 C11 C12 C16 C17 C21 C22 C26 C27 C31 C32 C36 C37 C41 C42: library part CC0402KRX5R7BB105, "CAP CER 1UF 16V X5R 0402", Case Code (Imperial)=0402, Case Code (Metric)=1005, Dielectric=X5R, LCSC Part Number=C325464, Manufacturer=Yageo, Max Operating Temperature=85°C, Min Operating Temperature=-55°C, Supplier Part Number 1=311-1691-6-ND, Tolerance=10%, Voltage Rating=16V, Capacitance=1uF, Case/Package=0402, ComponentLink1Description=http://www.yageo.com/documents/recent/UPY-GPHC_X5R_4V-to-50V_12.pdf?src-supplier=Avnet+Europe, ComponentLink1URL=http://www.yageo.com/documents/recent/UPY-GPHC_X5R_4V-to-50V_12.pdf?src-supplier=Avnet+Europe, Composition=Ceramic, Depth=0.5mm, Halogen Free="Halogen Free", Height=0.5mm, Item Type=Capacitor, Lead Free="Lead Free", Length=1mm, Manufacturer Part Number=CC0402KRX5R7BB105, Mount="Surface Mount", Packaging="Tape and Reel", Pricing 1="1=0.36, 10=0.252, 100=0.1512, 500=0.1134, 1000=0.09576, 2500=0.09072, 5000=0.08568 (USD)", Radiation Hardening=No, Stock 1=1405667, Supplier 1=Digi-Key, Termination=SMD/SMT, Thickness=0.022inch, Voltage Rating (DC)=16V, Weight=2.3E-05oz, Width=0.02inch
C3 C4 C5 C6 C7 C10 C13 C14 C15 C18 C19 C20 C23 C24 C25 C28 C29 C30 C33 C34 C35 C38 C39 C40 C43 C44 C45: library part CL10A106MA8NRNC, "CAP CER 10UF 25V X5R 0603", Case Code (Imperial)=0603, Case Code (Metric)=1608, Dielectric=X5R, LCSC Part Number=C96446, Manufacturer=Samsung, Max Operating Temperature=85°C, Min Operating Temperature=-55°C, Package Quantity=1, Tolerance=20%, Voltage Rating=25V, Capacitance=10uF, Case/Package=0603, Category="Ceramic Capacitors", ComponentLink1Description=https://datasheet.ciiva.com/25766/cl10a106ma8nrnc-25766562.pdf?src-supplier=Digi-Key, ComponentLink1URL=https://datasheet.ciiva.com/25766/cl10a106ma8nrnc-25766562.pdf?src-supplier=Digi-Key, Construction=Flat, Contact Plating=Tin, Lead Free="Lead Free", Length=0.063inch, Manufacturer Part Number=CL10A106MA8NRNC, Mount="Surface Mount", Packaging="Tape and Reel", Pricing 1="4000=0.03753, 8000=0.03700, 16000=0.03595, 24000=0.03515, 32000=0.03383, 40000=0.03304, 400000=0.03225 (USD)", RoHS=Yes, RoHS Compliant=Yes, Series=CL, Supplier 1=Avnet, Supplier Part Number 1=CL10A106MA8NRNC, Termination=Wraparound, Thickness=0.035inch, Width=0.031inch
C8 C9: library part GRM155R71H104ME14D, "CAP CER 0.1UF 50V X7R 0402", Capacitance=100nF, Case/Package=0402, LCSC Part Number=C182412, Manufacturer=Murata, Max Operating Temperature=125°C, Min Operating Temperature=-55°C, Tolerance=20%, Voltage Rating=50V, Category="Ceramic Capacitors", ComponentLink1Description=http://www.mouser.com/ds/2/281/c02e-2905.pdf?src-supplier=Mouser, ComponentLink1URL=http://www.mouser.com/ds/2/281/c02e-2905.pdf?src-supplier=Mouser, ComponentLink2Description=http://search.murata.co.jp/Ceramy/image/img/A01X/G101/ENG/GRM155R71H104ME14-01.pdf?src-supplier=Digi-Key, ComponentLink2URL=http://search.murata.co.jp/Ceramy/image/img/A01X/G101/ENG/GRM155R71H104ME14-01.pdf?src-supplier=Digi-Key, ComponentLink3Description=http://psearch.en.murata.com/capacitor/product/GRM155R71H104ME14%23.pdf?src-supplier=Avnet, ComponentLink3URL=http://psearch.en.murata.com/capacitor/product/GRM155R71H104ME14%23.pdf?src-supplier=Avnet, Item Type=Capacitor, Length=0.039inch, Manufacturer Part Number=GRM155R71H104ME14D, Mount="Surface Mount", Packaging="Cut Tape", Pricing 1="10000=0.00444, 20000=0.00420, 40000=0.00396, 60000=0.00372, 80000=0.00348, 100000=0.00324, 1000000=0.00300 (USD)", RoHS=Yes, RoHS Compliant=Yes, Stock 1=100000, Supplier 1=Avnet, Supplier Part Number 1=GRM155R71H104ME14D, Thickness=0.022inch, Width=0.02inch
J1 J5 J8 J11 J14 J17 J20 J23: "Wire Connecting Pads", Item Type="SMD Pads", Manufacturer Part Number="4 Pin SMD Wire Connector"
J2 J6 J9 J12 J15 J18 J21 J24: "Sensor Connecting Pads"
J3 J7 J10 J13 J16 J19 J22 J25: "Test Pad"
J4: "-40℃~+80℃ 15P Dual-sided contacts / top and bottom connection 0.5mm SMD,P=0.5mm,Surface Mount，Right Angle FFC, FPC (Flat Flexible) Connector Assemblies ROHS", LCSC Part Number=C19188796, Manufacturer=DIANWEI, Package="SMD,P=0.5mm,Surface Mount，Right Angle", ComponentLink1Description=LCSC, ComponentLink1URL=https://www.lcsc.com/product-detail/FFC-FPC-Flat-Flexible-Connector-Assemblies_DIANWEI-8-01A0-015200_C19188796.html?s_z=n_HC-FPC-05-20-15RLTAG, Item Type="FFC, FPC Connector", Manufacturer Part Number=8.01A0.015200
LED1 LED2 LED3 LED4 LED5 LED6 LED7 LED8: library part 19-217/S2C-AQ1R1B/3T, "0603(H=0.4mm) λD=600.5~612.5nm VR=5V VF=1.7V~2.2V IF=25mA PD=60mW", LCSC Part Number=C146215, Manufacturer=Everlight, Supplier Part Number 1=1080-19-217/S2C-AQ1R1B/3TTR-ND, Category=LEDs, ComponentLink1Description=LCSC, ComponentLink1URL=https://www.lcsc.com/product-detail/Light-Emitting-Diodes-LED_Everlight-Elec-19-217-S2C-AQ1R1B-3T_C146215.html, Item Type=LED, Manufacturer Part Number=19-217/S2C-AQ1R1B/3T, RoHS=No, Supplier 1=Digi-Key
R1 R9 R13 R17 R21 R25 R29 R33: library part RC0402FR-07240RL, "RES 240 OHM 1% 1/16W 0402", Case Code (Imperial)=0402, Case Code (Metric)=1005, Manufacturer=Yageo, Max Operating Temperature=155°C, Max Power Dissipation=63mW, Min Operating Temperature=-55°C, Package Quantity=1, Resistance Tolerance=1%, Resistor Type="Thick Film", Supplier Part Number 1=603-RC0402FR-07240RL, Temperature Coefficient=100ppm/°C, Voltage Rating=50V, Case/Package=0402, Category="Chip SMD Resistors", ComponentLink1Description=https://datasheet.ciiva.com/7849/1018594-7849915.pdf?src-supplier=Element14, ComponentLink1URL=https://datasheet.ciiva.com/7849/1018594-7849915.pdf?src-supplier=Element14, ComponentLink2Description=https://datasheet.ciiva.com/7849/1018594-7849916.pdf?src-supplier=Element14, ComponentLink2URL=https://datasheet.ciiva.com/7849/1018594-7849916.pdf?src-supplier=Element14, ComponentLink3Description=https://datasheet.ciiva.com/2519/pyu-r-int-thick-7-2519157.pdf?src-supplier=Digi-Key, ComponentLink3URL=https://datasheet.ciiva.com/2519/pyu-r-int-thick-7-2519157.pdf?src-supplier=Digi-Key, ComponentLink4Description=https://datasheet.ciiva.com/2519/pyu-r-int-thick-7-2519158.pdf?src-supplier=Digi-Key, ComponentLink4URL=https://datasheet.ciiva.com/2519/pyu-r-int-thick-7-2519158.pdf?src-supplier=Digi-Key, ComponentLink5Description=https://datasheet.ciiva.com/2519/pyu-r-int-thick-7-2519156.pdf?src-supplier=Digi-Key, ComponentLink5URL=https://datasheet.ciiva.com/2519/pyu-r-int-thick-7-2519156.pdf?src-supplier=Digi-Key, ComponentLink6Description=https://datasheet.ciiva.com/12669/pyu-rc0402-51-rohs-l-6-r-12669689.pdf?src-supplier=Mouser, ComponentLink6URL=https://datasheet.ciiva.com/12669/pyu-rc0402-51-rohs-l-6-r-12669689.pdf?src-supplier=Mouser, ComponentLink7Description=https://datasheet.ciiva.com/17419/pyu-rc0402-51-rohs-l-6-r-17419482.pdf?src-supplier=Future+Electronics, ComponentLink7URL=https://datasheet.ciiva.com/17419/pyu-rc0402-51-rohs-l-6-r-17419482.pdf?src-supplier=Future+Electronics, Construction=Rectangular, Depth=0.5mm, Features="Moisture Resistant", Height=0.016inch, Lead Free="Lead Free", Length=1mm, Manufacturer Part Number=RC0402FR-07240RL, Military Standard=Not, Number of Terminations=2, Packaging="Tape and Reel", Power Rating=63mW, Pricing 1="1=0.10000, 10=0.01200, 50=0.01200, 100=0.00500, 1000=0.00300, 10000=0.00100 (USD)", REACH SVHC=Unknown, Resistance=240R, RoHS=Yes, RoHS Compliant=Yes, Series=RC, Size Code=0402, Stock 1=1903202, Supplier 1=Mouser, Termination=SMD/SMT, Tolerance=1%, Voltage Rating (DC)=50V, Width=0.02inch
R2 R10 R14 R18 R22 R26 R30 R34: library part RC0402JR-071KL, "RES 1K OHM 5% 1/16W 0402", Case Code (Imperial)=0402, Case Code (Metric)=1005, LCSC Part Number=C105637, Manufacturer=Yageo, Max Operating Temperature=155°C, Max Power Dissipation=63mW, Min Operating Temperature=-55°C, Package Quantity=1, Power Rating=62.5mW, Resistance=1kR, Resistance Tolerance=5%, Resistor Type="Thick Film", Supplier Part Number 1=311-1.0KJRCT-ND, Temperature Coefficient=100ppm/°C, Voltage Rating=50V, Case/Package=0402, Category="Chip SMD Resistors", ComponentLink1Description=https://datasheet.ciiva.com/7983/1018594-7983558.pdf?src-supplier=Element14, ComponentLink1URL=https://datasheet.ciiva.com/7983/1018594-7983558.pdf?src-supplier=Element14, ComponentLink2Description=https://datasheet.ciiva.com/2452/pyu-r-int-thick-7-2452756.pdf?src-supplier=Digi-Key, ComponentLink2URL=https://datasheet.ciiva.com/2452/pyu-r-int-thick-7-2452756.pdf?src-supplier=Digi-Key, ComponentLink3Description=https://datasheet.ciiva.com/2452/pyu-r-int-thick-7-2452757.pdf?src-supplier=Digi-Key, ComponentLink3URL=https://datasheet.ciiva.com/2452/pyu-r-int-thick-7-2452757.pdf?src-supplier=Digi-Key, ComponentLink4Description=https://datasheet.ciiva.com/2452/pyu-r-int-thick-7-2452755.pdf?src-supplier=Digi-Key, ComponentLink4URL=https://datasheet.ciiva.com/2452/pyu-r-int-thick-7-2452755.pdf?src-supplier=Digi-Key, ComponentLink5Description=https://datasheet.ciiva.com/7850/1018594-7850170.pdf?src-supplier=Element14, ComponentLink5URL=https://datasheet.ciiva.com/7850/1018594-7850170.pdf?src-supplier=Element14, ComponentLink6Description=https://datasheet.ciiva.com/7850/1018594-7850171.pdf?src-supplier=Element14, ComponentLink6URL=https://datasheet.ciiva.com/7850/1018594-7850171.pdf?src-supplier=Element14, ComponentLink7Description=https://datasheet.ciiva.com/17081/pyu-rc0402-51-rohs-l-6-r-17081438.pdf?src-supplier=Future+Electronics, ComponentLink7URL=https://datasheet.ciiva.com/17081/pyu-rc0402-51-rohs-l-6-r-17081438.pdf?src-supplier=Future+Electronics, Construction=Rectangular, Depth=0.5mm, Features="Moisture Resistant", Height=0.016inch, Item Type=Resistor, Lead Free="Lead Free", Length=0.039inch, Manufacturer Part Number=RC0402JR-071KL, Military Standard=Not, Number of Terminations=2, Packaging="Tape and Reel", Pricing 1="1=0.10000, 10=0.01300, 100=0.00540, 1000=0.00244, 2500=0.00212, 5000=0.00175 (USD)", REACH SVHC="No SVHC", RoHS=Yes, RoHS Compliant=Yes, Series=RC, Size Code=0402, Stock 1=452315, Supplier 1=Digi-Key, Termination=SMD/SMT, Tolerance=5%, Width=0.02inch
R3 R4 R11 R12 R15 R16 R19 R20 R23 R24 R27 R28 R31 R32 R35 R36: library part RC0402JR-07150KL, "RES SMD 0402 150kOhm 5% Paper T/R", Case Code (Imperial)=0402, Case Code (Metric)=1005, LCSC Part Number=C137919, Manufacturer=Yageo, Max Operating Temperature=155°C, Max Power Dissipation=63mW, Min Operating Temperature=-55°C, Package Quantity=1, Resistance=150kR, Resistance Tolerance=5%, Resistor Type="Thick Film", Temperature Coefficient=100ppm/°C, Voltage Rating=50V, Case/Package=0402, Category="Chip SMD Resistors", ComponentLink1Description=https://datasheet.ciiva.com/7983/1018594-7983551.pdf?src-supplier=Element14, ComponentLink1URL=https://datasheet.ciiva.com/7983/1018594-7983551.pdf?src-supplier=Element14, ComponentLink2Description=https://datasheet.ciiva.com/2518/pyu-r-int-thick-7-2518929.pdf?src-supplier=Digi-Key, ComponentLink2URL=https://datasheet.ciiva.com/2518/pyu-r-int-thick-7-2518929.pdf?src-supplier=Digi-Key, ComponentLink3Description=https://datasheet.ciiva.com/2518/pyu-r-int-thick-7-2518930.pdf?src-supplier=Digi-Key, ComponentLink3URL=https://datasheet.ciiva.com/2518/pyu-r-int-thick-7-2518930.pdf?src-supplier=Digi-Key, ComponentLink4Description=https://datasheet.ciiva.com/2518/pyu-r-int-thick-7-2518928.pdf?src-supplier=Digi-Key, ComponentLink4URL=https://datasheet.ciiva.com/2518/pyu-r-int-thick-7-2518928.pdf?src-supplier=Digi-Key, ComponentLink5Description=https://datasheet.ciiva.com/7850/1018594-7850149.pdf?src-supplier=Element14, ComponentLink5URL=https://datasheet.ciiva.com/7850/1018594-7850149.pdf?src-supplier=Element14, ComponentLink6Description=https://datasheet.ciiva.com/17072/pyu-rc0402-51-rohs-l-6-r-17072379.pdf?src-supplier=Future+Electronics, ComponentLink6URL=https://datasheet.ciiva.com/17072/pyu-rc0402-51-rohs-l-6-r-17072379.pdf?src-supplier=Future+Electronics, ComponentLink7Description=https://datasheet.ciiva.com/15189/getdatasheetpartid-251830-15189543.pdf?src-supplier=Verical, ComponentLink7URL=https://datasheet.ciiva.com/15189/getdatasheetpartid-251830-15189543.pdf?src-supplier=Verical, Construction=Rectangular, Depth=0.5mm, Features="Moisture Resistant", Height=0.016inch, Item Type=Resistor, Lead Free="Lead Free", Length=1mm, Manufacturer Part Number=RC0402JR-07150KL, Military Standard=Not, Number of Terminations=2, Packaging="Tape and Reel", Power Rating=63mW, Pricing 1="10000=0.00100 (USD)", REACH SVHC="No SVHC", RoHS=Yes, RoHS Compliant=Yes, Series=RC, Size Code=0402, Stock 1=170000, Supplier 1="Arrow Electronics", Supplier Part Number 1=RC0402JR-07150KL, Termination=SMD/SMT, Tolerance=5%, Weight=2.3E-05oz, Width=0.02inch
R5 R6: library part ARG03DTC6402N, "1/10W Thin Film Resistor 75V ±0.5% ±25ppm/℃ -55℃~+155℃ 64kΩ 0603 Chip Resistor - Surface Mount ROHS", LCSC Part Number=C2902643, Manufacturer="iking Tech", ComponentLink1Description=LCSC, ComponentLink1URL=https://lcsc.com/product-detail/Chip-Resistor-Surface-Mount_Viking-Tech-ARG03DTC6402N_C2902643.html, Item Type=Resistor, Manufacturer Part Number=ARG03DTC6402N
R7 R8: library part RC0402FR-0710KL, "RES 10K OHM 1% 1/16W 0402", Case Code (Imperial)=0402, Case Code (Metric)=1005, LCSC Part Number=C60490, Manufacturer=Yageo, Max Operating Temperature=155°C, Max Power Dissipation=63mW, Min Operating Temperature=-55°C, Power Rating=62.5mW, Resistance=10kR, Resistance Tolerance=1%, Resistor Type="Thick Film", Supplier Part Number 1=603-RC0402FR-0710KL, Temperature Coefficient=100ppm/°C, Voltage Rating=50V, Case/Package=0402, Category="Chip SMD Resistors", ComponentLink1Description=https://datasheet.ciiva.com/7660/38568-7660787.pdf?src-supplier=Element14, ComponentLink1URL=https://datasheet.ciiva.com/7660/38568-7660787.pdf?src-supplier=Element14, ComponentLink2Description=https://datasheet.ciiva.com/7849/1686128-7849814.pdf?src-supplier=Element14, ComponentLink2URL=https://datasheet.ciiva.com/7849/1686128-7849814.pdf?src-supplier=Element14, ComponentLink3Description=https://datasheet.ciiva.com/7983/1018594-7983486.pdf?src-supplier=Element14, ComponentLink3URL=https://datasheet.ciiva.com/7983/1018594-7983486.pdf?src-supplier=Element14, ComponentLink4Description=https://datasheet.ciiva.com/22747/1018594-22747512.pdf?src-supplier=Element14, ComponentLink4URL=https://datasheet.ciiva.com/22747/1018594-22747512.pdf?src-supplier=Element14, ComponentLink5Description=https://datasheet.ciiva.com/12667/pyu-rc0402-51-rohs-l-6-r-12667067.pdf?src-supplier=Mouser, ComponentLink5URL=https://datasheet.ciiva.com/12667/pyu-rc0402-51-rohs-l-6-r-12667067.pdf?src-supplier=Mouser, ComponentLink6Description=https://datasheet.ciiva.com/7849/1784430-7849813.pdf?src-supplier=Element14, ComponentLink6URL=https://datasheet.ciiva.com/7849/1784430-7849813.pdf?src-supplier=Element14, ComponentLink7Description=https://datasheet.ciiva.com/7849/1784430-7849815.pdf?src-supplier=Element14, ComponentLink7URL=https://datasheet.ciiva.com/7849/1784430-7849815.pdf?src-supplier=Element14, Construction=Rectangular, Depth=0.5mm, Features="Moisture Resistant", Height=0.32mm, Lead Free="Lead Free", Lead Pitch=0.2mm, Length=1mm, Manufacturer Part Number=RC0402FR-0710KL, Military Standard=Not, Number of Pins=2, Number of Terminations=2, Packaging="Tape and Reel", Pricing 1="1=0.10000, 10=0.01400, 50=0.01400, 100=0.00500, 1000=0.00300, 10000=0.00200 (USD)", REACH SVHC="No SVHC", RoHS=Yes, RoHS Compliant=Yes, Series=RC, Stock 1=18648329, Supplier 1=Mouser, Termination=SMD/SMT, Tolerance=1%, Voltage Rating (DC)=50V, Width=0.5mm, Working Voltage=50V
SB1 SB2 SB3 SB4 SB5 SB6 SB7 SB8 SB9 SB10 SB11 SB12 SB13 SB14 SB15 SB16 SB17 SB18 SB19 SB20 SB21 SB22 SB23 SB24 SB25 SB26 SB27 SB28 SB29 SB30 SB101 SB102 SB103 SB104 SB105 SB106 SB107 SB108 SB109 SB110 SB111 SB112 SB201 SB202 SB203 SB204 SB205 SB206 SB207 SB208 SB209 SB210 SB211 SB212 SB301 SB302 SB303 SB304 SB305 SB306 SB307 SB308 SB309 SB310 SB311 SB312 SB401 SB402 SB403 SB404 SB405 SB406 SB407 SB408 SB409 SB410 SB411 SB412 SB501 SB502 SB503 SB504 SB505 SB506 SB507 SB508 SB509 SB510 SB511 SB512 SB513 SB601 SB602 SB603 SB604 SB605 SB606 SB607 SB608 SB609 SB610 SB611 SB612 SB701 SB702 SB703 SB704 SB705 SB706 SB707 SB708 SB709 SB710 SB711 SB712 SB801 SB802 SB803 SB804 SB805 SB806 SB807 SB808 SB809 SB810 SB811 SB812: "Solder Bridge ON", Item Type="Solder Bridge", Manufacturer Part Number="Solder Bridge 0402"
SW1 SW2: "No Gull Wing 50mA 100MΩ 80000 260gf@±50gf 12V -25℃~+85℃ 1.7mm Golden Round Button Brick nogging SPST SMD Tactile Switches ROHS", LCSC Part Number=C2845290, Manufacturer=HCTL, ComponentLink1Description=LCSC, ComponentLink1URL=https://www.lcsc.com/product-detail/Tactile-Switches_HCTL-TC-0522C-1-7-260G_C2845290.html, Item Type=Switch, Manufacturer Part Number=TC-0522C-1.7-260G
U1 U7 U9 U11 U13 U15 U17 U19: "IC OPAMP INSTR 825KHZ 8SOIC", Case/Package=SOIC, Input Bias Current=1.5nA, Input Offset Voltage (Vos)=60uV, Input Resistance=100GR, LCSC Part Number=C13342, Manufacturer="Analog Devices", Max Dual Supply Voltage=18V, Max Operating Temperature=85°C, Max Power Dissipation=200mW, Min Dual Supply Voltage=2.3V, Min Operating Temperature=-40°C, Nominal Supply Current=1mA, Operating Supply Voltage=36V, Output Current per Channel=18mA, Package Quantity=1000, Power Supply Rejection Ratio (PSRR)=130dB, Quiescent Current=900uA, Supplier Part Number 1=584-AD8221ARZ-R7, Voltage Gain=60dB, -3db Bandwidth=825kHz, Bandwidth=562kHz, Category="Amplifiers - Op Amps, Buffer, Instrumentation", Common Mode Rejection Ratio=80dB, ComponentLink1Description=https://datasheet.ciiva.com/15128/getdatasheetpartid-313520-15128733.pdf?src-supplier=Verical, ComponentLink1URL=https://datasheet.ciiva.com/15128/getdatasheetpartid-313520-15128733.pdf?src-supplier=Verical, ComponentLink2Description=https://datasheet.ciiva.com/2975/ad8221-2975658.pdf?src-supplier=Avnet, ComponentLink2URL=https://datasheet.ciiva.com/2975/ad8221-2975658.pdf?src-supplier=Avnet, ComponentLink3Description=https://datasheet.ciiva.com/2975/ad8221-2975980.pdf?src-supplier=Avnet, ComponentLink3URL=https://datasheet.ciiva.com/2975/ad8221-2975980.pdf?src-supplier=Avnet, ComponentLink4Description=https://datasheet.ciiva.com/6628/ad8221-6628618.pdf?src-supplier=Digi-Key, ComponentLink4URL=https://datasheet.ciiva.com/6628/ad8221-6628618.pdf?src-supplier=Digi-Key, ComponentLink5Description=https://datasheet.ciiva.com/6628/ad8221-6628619.pdf?src-supplier=Digi-Key, ComponentLink5URL=https://datasheet.ciiva.com/6628/ad8221-6628619.pdf?src-supplier=Digi-Key, ComponentLink6Description=https://datasheet.ciiva.com/6628/ad8221-6628617.pdf?src-supplier=Digi-Key, ComponentLink6URL=https://datasheet.ciiva.com/6628/ad8221-6628617.pdf?src-supplier=Digi-Key, ComponentLink7Description=https://datasheet.ciiva.com/48709/001249009-da-01-en-ic-amp-inst-prec-ad8221arz-r7-soic-8-adi-48709526.pdf?src-supplier=Conrad, ComponentLink7URL=https://datasheet.ciiva.com/48709/001249009-da-01-en-ic-amp-inst-prec-ad8221arz-r7-soic-8-adi-48709526.pdf?src-supplier=Conrad, Contact Plating=Tin,Matte, Item Type=IC, Lead Free="Contains Lead", Manufacturer Part Number=AD8221ARZ-R7, Number of Channels=1, Number of Circuits=1, Number of Elements=1, Number of Pins=8, Operating Supply Current=1mA, Packaging="Tape and Reel", Power Dissipation=200mW, Pricing 1="1=7.37000, 10=6.66000, 25=6.35000, 50=6.35000, 100=5.51000, 250=5.27000, 500=4.80000, 1000=4.37000, 10000=4.37000 (USD)", Radiation Hardening=No, RoHS=Yes, RoHS Compliant=Yes, Series=-, Slew Rate=2.5V/µs, Supplier 1=Mouser, Supply Current=1mA
U2 U3 U8 U10 U12 U14 U16 U18 U20: "NO Charge pump 1 -5.5V~-1.4V 1.4V~5.5V 60mA 19kHz SOT-23-5 DC-DC Converters ROHS", LCSC Part Number=C80403, Manufacturer="SG Micro", Category=Uncategorized, Item Type=IC, Manufacturer Part Number=SGM3207YN5G/TR, Pricing 1="3000=0.38750, 6000=0.36250, 12000=0.33750, 18000=0.32500, 24000=0.31250, 30000=0.31250, 300000=0.30500 (USD)", RoHS=No, Supplier 1=Avnet, Supplier Part Number 1=SGM3207YN5G/TR
U4: "SOT-23-5 Operational Amplifier ROHS", LCSC Part Number=C2923365, Manufacturer="TECH PUBLIC", ComponentLink1Description=LCSC, ComponentLink1URL=https://www.lcsc.com/product-detail/Operational-Amplifier_TECH-PUBLIC-TPMCP6021T-E-OT_C2923365.html, Item Type=IC, Manufacturer Part Number=TPMCP6021T-E/OT